# Altium PCB PCB-Thermostat.PcbDoc (part 4 of 5)
Units mm, origin at the board's own origin, x right, y up, seen from the top; angles counter-clockwise.
Board outline 100 x 90 mm, 4 copper layers (Top, PWR, GND, Bottom), stack 1.585 mm thick; 188 components, 167 nets, 703 pads, 398 vias.
Unrouted connection lines stored in the file: 2.
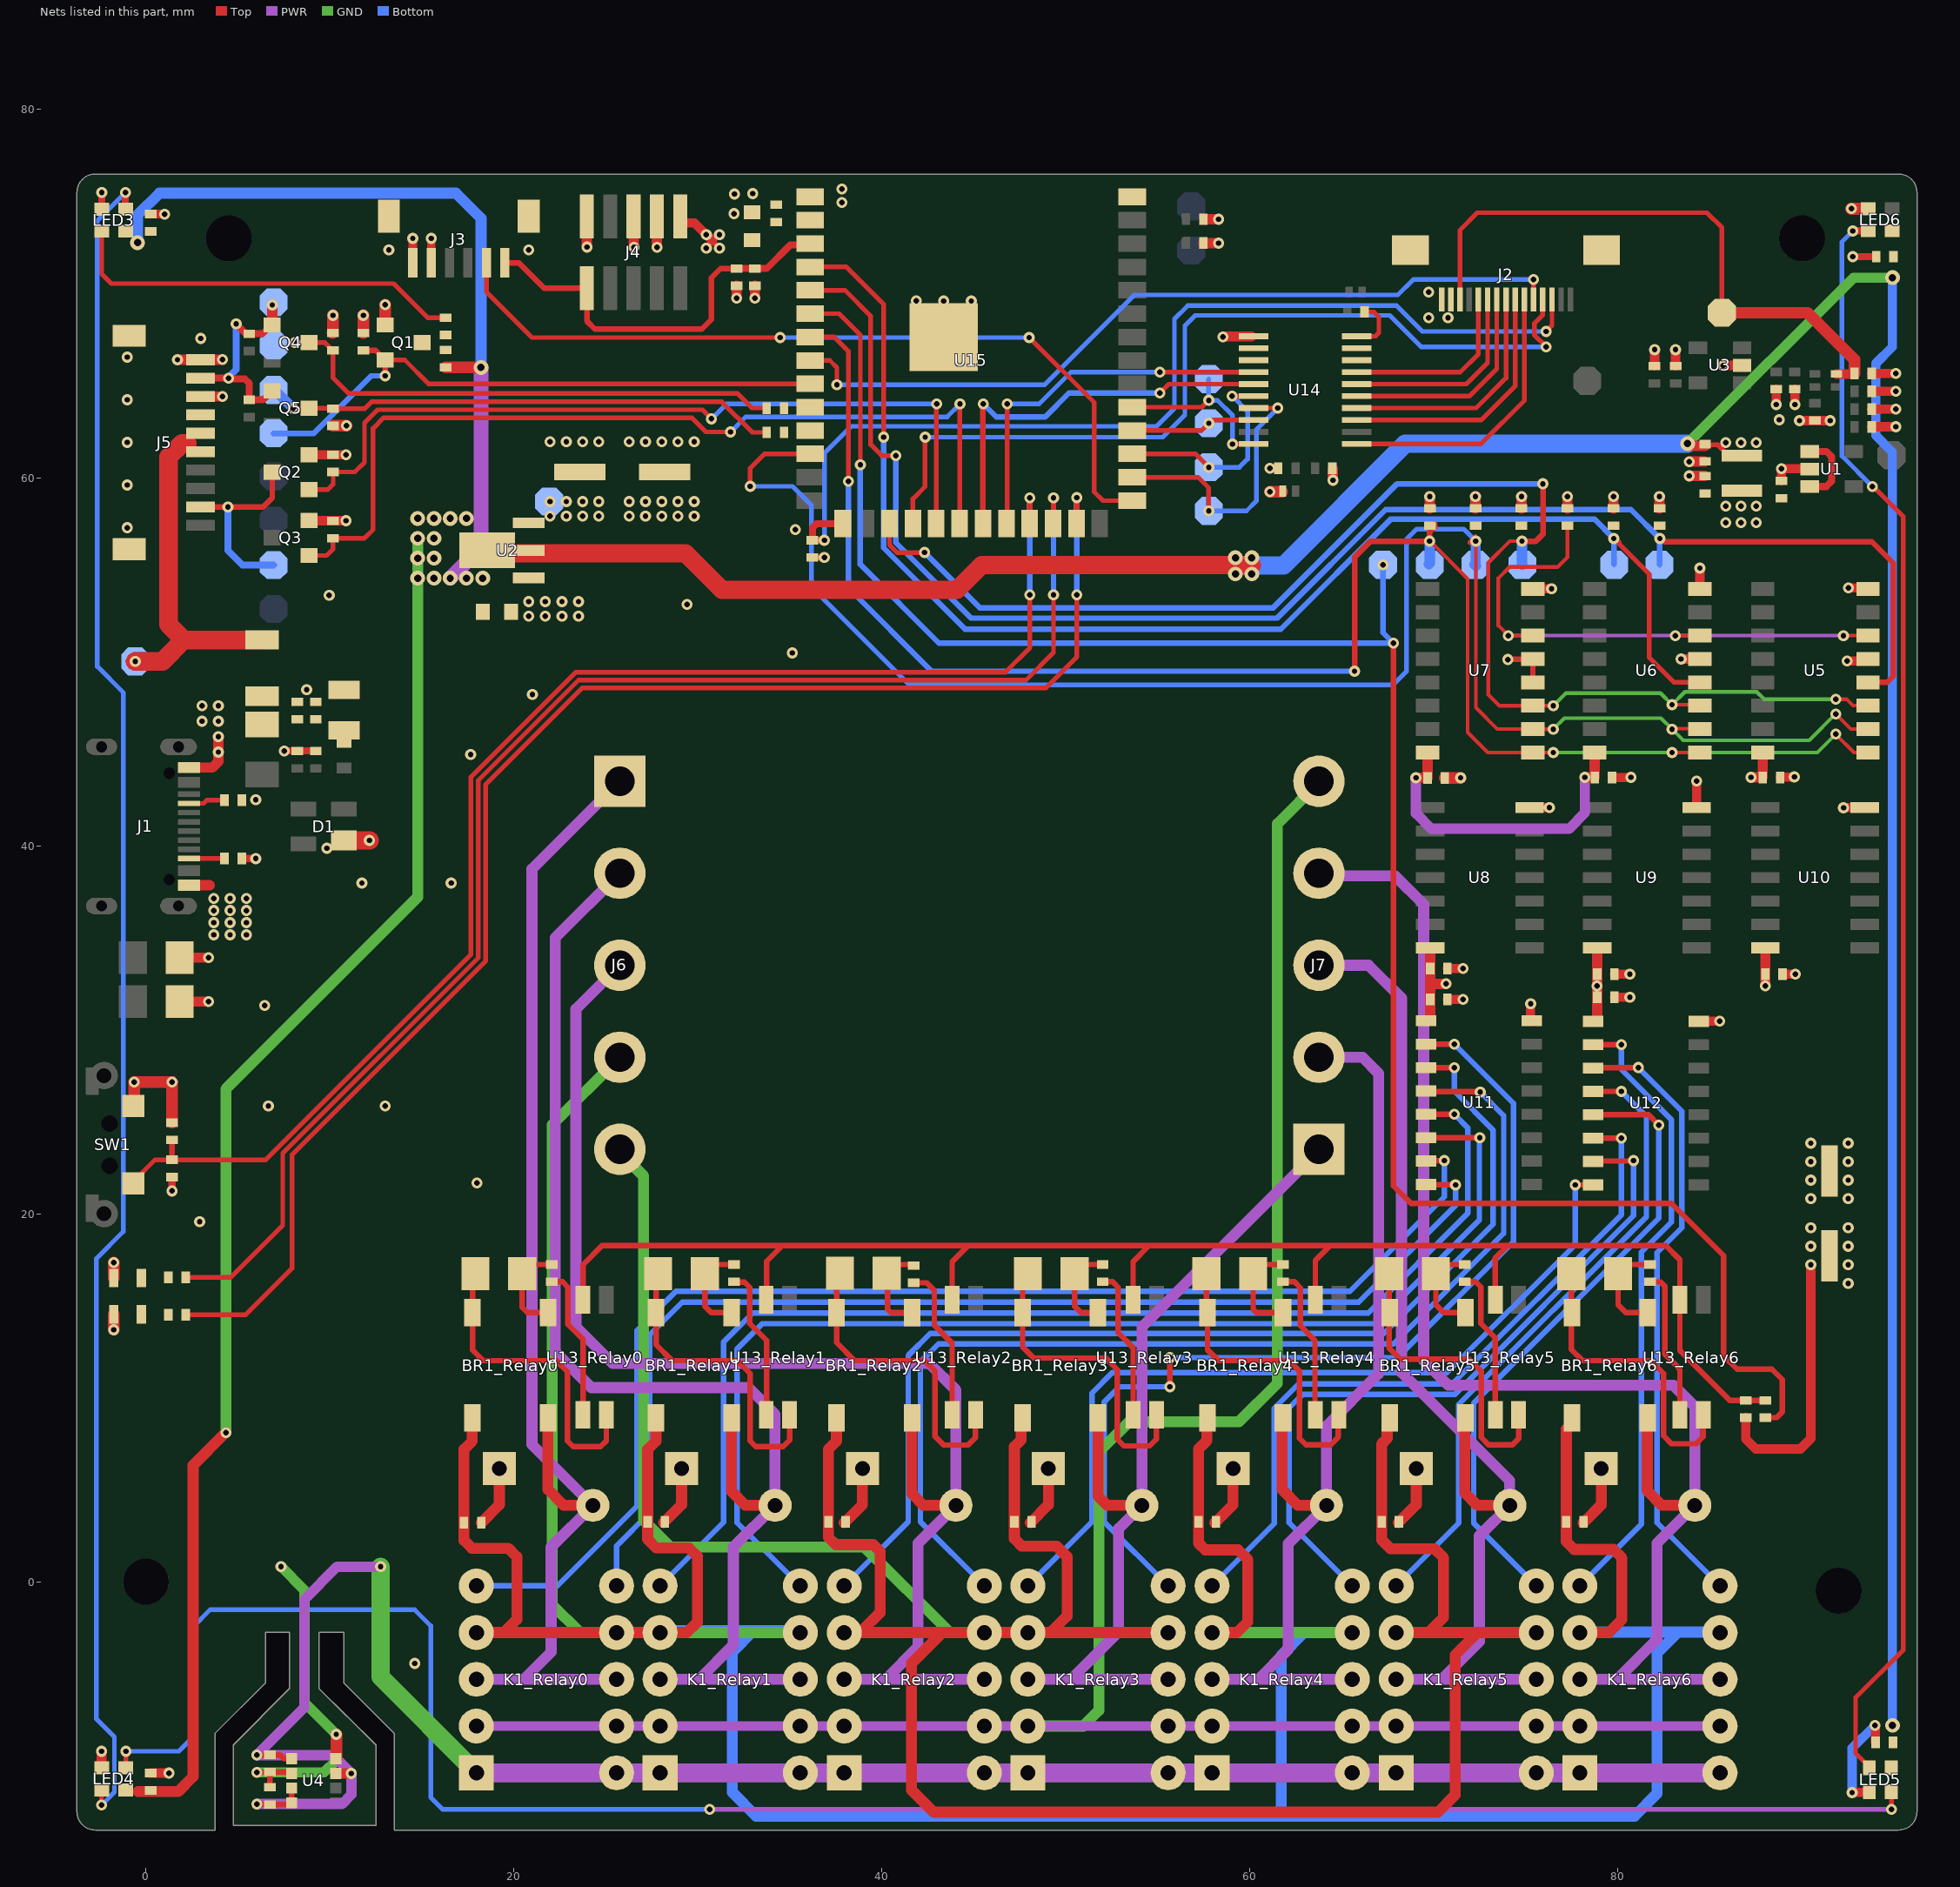
[diagram p4: the nets of this part, all layers, seen from the top]

## Via types
v1: diameter 0.6, hole 0.3, Top to Bottom, 374 vias
v2: diameter 0.8, hole 0.4, Top to Bottom, 22 vias
v3: diameter 0.6, hole 0.3, Top to Bottom, tented top, 2 vias

## Nets (pads, with @x,y where several pads share a name; then routed paths per layer and width w, separated by ;. In a path a pad name is that pad's centre, name@x,y a point inside that pad or via, vN(x,y) a via of type N, cw(c..) or ccw(c..) an arc to the next point about the centre after c; other vN are vias at no path point) (continued)
3V3_SENSOR: C12.1 FB3.2 J2.13 P2.1 | length 33.4
  Top w0.254: J2.13@71.414,69.679 71.414,73.454 72.357,74.397 84.835,74.397 85.649,73.583 P2.1@85.649,68.961 ; FB3.2@91.872,65.628 FB3.2@91.887,65.644
  Top w0.508: FB3.2@91.872,65.628 92.824,65.628 92.85,65.653 C12.1@92.85,65.659
  Top w0.635: P2.1@85.649,68.961 90.297,68.961 92.85,66.408 C12.1@92.85,65.659
5V_Clean: C2.1 C3.2 L1.2 U1.1 U1.3 | length 4
  Top w0.381: U1.3@90.421,59.515 91.321,59.515 91.621,59.815 91.621,61.135 91.34,61.415 U1.1@90.421,61.415
  other v1: 85.852,57.556 86.684,57.556 87.516,57.556 85.852,58.445 86.684,58.445 87.516,58.445
5V_TABLET: F2.2 J5.5 J5.6 P18.1 | length 19
  Top w1.016: v1(-0.584,50.013) 0.889,50.013 2.057,51.181 ; 2.248,61.862 1.968,61.862 1.219,61.112 1.219,52.019 2.057,51.181 ; F2.2@6.32,51.181 2.057,51.181
+1V8: J5.2 P19.1 Q4.1 Q5.1 R28.2 R30.2 | length 11.7
  Top w0.381: J5.2@2.961,65.409 v1(4.496,65.409) 4.529,65.375 5.367,65.375 5.613,65.129 R30.2@5.613,64.229 6.372,64.229 6.595,64.452 6.595,64.5 6.815,64.719 Q5.1@6.865,64.719 ; v1(4.902,68.351) 5.4,67.854 5.575,67.854 R28.2@5.613,67.816 6.334,67.816 6.815,68.296 Q4.1@6.865,68.296
  Top w0.559: Q4.1@6.865,68.296 v1(6.865,69.386)
  Bottom w0.381: v1(4.496,65.409) 4.496,65.468 4.902,65.874 v1(4.902,68.351)
  Bottom w0.559: P19.1@6.857,69.394 v1(6.865,69.386)
+3V3: C17.1 C18.1 C21.1 C22.1 C23.1 C24.1 C25.1 C26.1 C27.1 C28.1 C29.1 C30.1 C34.1 C35.1 FB6.2 J3.1 J4.1 K1_Relay0.1 K1_Relay0.10 K1_Relay1.1 K1_Relay1.10 K1_Relay2.1 K1_Relay2.10 K1_Relay3.1 K1_Relay3.10 K1_Relay4.1 K1_Relay4.10 K1_Relay5.1 K1_Relay5.10 K1_Relay6.1 K1_Relay6.10 P4.1 Q1.1 R4.2 R5.2 R6.2 R7.2 R8.2 R9.2 R10.2 R15.2 R16.2 R17.2 R20.2 R24.2 R29.1 R31.1 R32.2 U2.3 U4.2 U4.5 U4.6 U4.8 U5.16 U6.16 U7.16 U8.14 U9.14 U10.14 U11.9 U12.9 U15.2 | length 241.9
  Top w0.2: v1(6.02,-12.09) v1@6.032,-12.103 ; v1@6.02,-9.449 v1@6.041,-9.427 ; C21.1@6.71,-9.427 C21.1@6.731,-9.406 ; C22.1@6.718,-12.103 C22.1@6.731,-12.116
  Top w0.254: R31.1@9.995,62.802 R31.1@10.008,62.814 ; FB6.2@61.745,59.233 FB6.2@61.781,59.269
  Top w0.3: v1@6.032,-12.103 C22.1@6.718,-12.103 ; v1@6.041,-9.427 C21.1@6.71,-9.427 ; C22.1@6.731,-12.116 7.823,-12.116 U4.5@7.919,-12.02 U4.6@7.919,-11.22 ; C21.1@6.731,-9.406 6.751,-9.427 7.293,-9.427 7.487,-9.62 U4.8@7.919,-9.62 U4.8@7.816,-9.518 ; R32.2@36.223,55.659 v1(36.869,55.659)
  Top w0.406: v1(1.422,21.234) R20.2@1.422,21.989
  Top w0.457: v1(14.5,73) 14.505,72.995 J3.1@14.505,72.368
  Top w0.508: J4.1@29.046,74.873 29.046,73.963 29.166,73.843 29.814,73.843 30.803,72.854 ; R10.2@86.944,8.913 86.944,7.759 87.49,7.214 89.918,7.214 90.479,7.775 v1(90.479,17.219)
  Top w0.559: U4.2@10.566,-10.425 v1@11.161,-10.425 ; v1(32.106,69.748) R15.2@32.106,70.422 ; R16.2@57.467,72.746 v1(58.293,72.746) ; R17.2@57.518,74.041 v1(58.293,74.041) ; v3(69.019,43.686) C23.1@69.654,43.686 ; U11.9@69.569,30.479 69.774,30.479 69.794,30.5 C29.1@69.794,31.648 69.794,32.487 ; C23.1@69.654,43.686 U7.16@69.654,45.064 ; R5.2@69.774,58.327 v1(69.774,58.979) ; U8.14@69.794,34.449 C26.1@69.794,33.326 69.794,32.487 ; R6.2@72.256,58.327 v1(72.256,58.979) ; R7.2@74.756,58.327 v1(74.756,58.979) ; R4.2@77.256,58.327 v1(77.256,58.979) ; v3(78.2,43.709) C24.1@78.74,43.709 78.736,43.713 78.736,45.059 U6.16@78.731,45.064 ; U12.9@78.646,30.454 78.851,30.454 78.871,30.474 C30.1@78.871,31.759 78.869,31.761 78.869,32.377 v1(78.866,32.379) 78.869,32.381 78.869,33.006 C27.1@78.871,33.009 U9.14@78.871,34.449 ; R9.2@79.756,58.327 v1(79.756,58.979) ; R8.2@82.256,58.327 v1(82.256,58.979) ; v1(87.231,43.709) C25.1@87.866,43.709 U5.16@87.866,45.064 ; v1(88.006,32.379) C28.1@88.006,33.02 U10.14@88.006,34.449 ; 69.794,32.487 v1@70.656,32.487 ; v1@70.656,32.487 v1(70.657,32.488)
  Top w0.635: R29.1@10.147,67.869 10.16,67.882 v1(10.16,68.821) ; R31.1@10.173,62.827 v1(10.895,62.827) ; R24.2@11.811,67.856 v1(11.811,68.821) ; Q1.1@13.005,68.296 v1(13.005,69.393) ; v1(61.087,59.233) FB6.2@61.745,59.233
  PWR w0.559: v1@6.039,-12.083 10.65,-12.083 11.163,-11.57 v1(11.163,-10.427) ; v1@11.155,-10.419 10.16,-9.423 v1(6.02,-9.423) 8.6,-6.843 8.6,-0.969 10.382,0.813 v1(12.751,0.813) ; v3(69.019,43.686) 69.019,41.756 69.856,40.919 77.339,40.919 78.2,41.78 v3(78.2,43.709)
  PWR w1: K1_Relay0.1@17.958,-10.389 K1_Relay0.10@25.578,-10.389 K1_Relay1.1@27.94,-10.389 K1_Relay1.10@35.56,-10.389 K1_Relay2.1@37.948,-10.389 K1_Relay2.10@45.568,-10.389 K1_Relay3.1@47.93,-10.389 K1_Relay3.10@55.55,-10.389 K1_Relay4.1@57.937,-10.389 K1_Relay4.10@65.557,-10.389 K1_Relay5.1@67.945,-10.389 K1_Relay5.10@75.565,-10.389 K1_Relay6.1@77.927,-10.389 K1_Relay6.10@85.547,-10.389
  GND w0.559: v1@6.031,-12.09 v1@6.039,-12.083
  GND w1: v1(12.751,0.813) 12.751,-5.182 K1_Relay0.1@17.958,-10.389 K1_Relay0.10@25.578,-10.389 K1_Relay1.1@27.94,-10.389 K1_Relay1.10@35.56,-10.389 K1_Relay2.1@37.948,-10.389 K1_Relay2.10@45.568,-10.389 K1_Relay3.1@47.93,-10.389 K1_Relay3.10@55.55,-10.389 K1_Relay4.1@57.937,-10.389 K1_Relay4.10@65.557,-10.389 K1_Relay5.1@67.945,-10.389 K1_Relay5.10@75.565,-10.389 K1_Relay6.1@77.927,-10.389 K1_Relay6.10@85.547,-10.389
  other v1: 92.517,16.212 92.517,17.219 90.479,18.227 92.517,18.227 90.479,19.234 92.517,19.234 21.965,57.912 22.847,57.912 23.73,57.912 24.613,57.912 21.965,58.699 22.847,58.699 23.73,58.699 24.613,58.699 21.965,61.951 22.847,61.951 23.73,61.951 24.613,61.951 30.455,72.466 31.166,72.466 30.455,73.203 31.166,73.203
+5V: C1.2 C13.1 C38.1 C39.1 C40.1 C41.1 F1.2 L1.1 LED3.1 LED4.1 LED5.1 LED6.1 R25.1 U2.2 | length 286.1
  Top w0.254: C1.2@84.736,61.779 85.428,61.779 L1.1@85.961,61.246
  Top w0.559: v2@83.781,61.719 C1.2@84.736,61.719
  Top w0.6: -0.418,-11.405 1.753,-11.405 2.565,-10.592 2.565,6.325 v1(4.343,8.103)
  Top w0.635: R25.1@16.281,65.996 18.227,65.996 v2@18.237,65.986
  Top w1: U2.2@18.54,56.045 18.705,55.88 23.343,55.88 29.321,55.88 31.302,53.899 44.081,53.899 45.427,55.245 v2@60.096,55.245
  PWR w0.8: v2(16.535,54.534) 18.212,56.21 v2(18.212,65.986)
  GND w0.559: v2(83.781,61.846) 92.802,70.866 v2(94.92,70.866)
  GND w0.6: v1(4.343,8.103) 4.343,26.772 14.77,37.198 v2(14.77,54.534) v2(14.77,55.618) v2(14.77,56.701)
  Bottom w0.5: v2(94.92,-7.81) 94.92,61.392 94.005,62.306 94.005,66.192 94.92,67.107 v2(94.92,70.866)
  Bottom w0.6: v2(-0.457,72.771) -0.457,74.27 0.737,75.463 16.84,75.463 18.212,74.092 v2(18.212,65.986)
  Bottom w1: 59.258,55.232 61.822,55.232 68.435,61.845 v2(83.781,61.846)
  other v1: 85.852,61.9 86.684,61.9 87.516,61.9
  other v2: 15.653,54.534 17.418,54.534 18.301,54.534 59.207,54.762 60.096,54.762 15.653,55.618 59.207,55.643 60.096,55.643 15.653,56.701 14.77,57.785 15.653,57.785 16.535,57.785 17.418,57.785
+BATT: J5.4
A1: J2.6 U14.1 | length 15.5
  Top w0.254: U14.1@65.903,61.834 72.559,61.834 74.914,64.188 J2.6@74.914,69.679
A2: J2.7 U14.3 | length 14
  Top w0.254: U14.3@65.903,63.134 72.577,63.134 74.414,64.971 J2.7@74.414,69.679
A3: J2.8 U14.4 | length 13
  Top w0.254: U14.4@65.903,63.784 72.289,63.784 73.914,65.409 J2.8@73.914,69.679
A4: J2.9 U14.5 | length 11.9
  Top w0.254: U14.5@65.903,64.434 71.939,64.434 73.414,65.909 J2.9@73.414,69.679
A5: J2.10 U14.6 | length 10.9
  Top w0.254: U14.6@65.903,65.084 71.752,65.084 72.914,66.246 J2.10@72.914,69.679
A6: J2.11 U14.7 | length 9.9
  Top w0.254: U14.7@65.903,65.734 71.427,65.734 72.414,66.721 J2.11@72.414,69.679
A7: U14.8
A8: U14.9
B: BR1_Relay3.4 J7.1 K1_Relay3.3 K1_Relay3.8 RV1_Relay3.2 | length 48.9
  Top w0.6: BR1_Relay3.4@51.743,8.903 51.743,4.645 52.241,4.147 RV1_Relay3.2@54.127,4.147 RV1_Relay3.2@54.127,4.141
  PWR w0.6: K1_Relay3.3@47.93,-5.309 50.267,-5.309 ; K1_Relay3.8@55.55,-5.309 50.267,-5.309 ; J7.1@63.805,23.503 54.127,13.825 RV1_Relay3.2@54.127,4.147 52.863,2.882 52.863,-2.712 50.267,-5.309
B1: P16.1 U14.20 U15.31 | length 9.7
  Top w0.254: U15.31@53.6,63.83 57.386,63.83 v1(57.76,64.204) ; v1(59.055,61.824) 59.06,61.829 60.098,61.829 U14.20@60.103,61.834
  Bottom w0.254: P16.1@57.76,65.354 v1(57.76,64.204) 58.224,64.204 59.055,63.373 v1(59.055,61.824)
B2: P15.1 U14.18 U15.30 | length 6.7
  Top w0.254: U15.30@53.6,62.56 57.361,62.56 v1(57.76,62.958) 57.853,62.958 58.029,63.134 U14.18@60.103,63.134
B3: P13.1 U14.17 U15.28 | length 15.4
  Top w0.254: U15.28@53.6,60.02 57.183,60.02 57.76,59.443 v1(57.76,58.191) ; U14.17@59.82,63.784 U14.17@59.823,63.781 ; U14.17@60.103,63.784 v1(61.516,63.784)
  Bottom w0.254: v1(57.76,58.191) 59.807,58.191 60.343,58.727 60.343,62.611 v1(61.516,63.784)
B4: P14.1 U14.16 U15.29 | length 11.6
  Top w0.254: U15.29@53.6,61.29 57.032,61.29 v1(57.76,60.562) ; v1(59.03,64.44) 59.033,64.437 60.1,64.437 U14.16@60.103,64.434
  Bottom w0.254: v1(57.76,60.562) 59.422,60.562 59.871,61.011 59.871,63.599 v1(59.03,64.44)
B5: U14.15 U15.21 | length 22.1
  Top w0.254: v1(55.1,64.596) 55.588,65.084 U14.15@60.103,65.084
  Top w0.305: U15.21@45.49,57.5 v1@45.49,63.981
  Bottom w0.305: v1(45.509,64) 46.213,63.297 48.87,63.297 50.169,64.596 v1(55.1,64.596)
B6: U14.14 U15.22 | length 20.7
  Top w0.254: U15.22@46.779,57.424 46.783,57.428 46.812,57.457 v1(46.812,64) ; v1(55.1,65.734) U14.14@60.103,65.734
  Top w0.305: U15.22@46.783,57.42 U15.22@46.783,57.428
  Top w0.381: U15.22@46.779,57.424 U15.22@46.779,57.526
  Bottom w0.254: v1(46.812,64) 48.532,64 50.266,65.734 v1(55.1,65.734)
B7: U14.13
B8: U14.12
BR1_Relay0: BR1_Relay0.1 C31_Relay0.2 R13_Relay0.2 | length 5.2
  Top w0.3: BR1_Relay0.1@21.847,14.623 20.733,14.623 20.447,14.909 C31_Relay0.2@20.447,16.739 20.942,17.234 R13_Relay0.2@22.047,17.234
BR1_Relay1: BR1_Relay1.1 C31_Relay1.2 R13_Relay1.2 | length 5.2
  Top w0.3: BR1_Relay1.1@31.822,14.623 30.72,14.623 30.374,14.969 30.374,16.739 30.869,17.234 R13_Relay1.2@31.974,17.234
BR1_Relay2: BR1_Relay2.1 C31_Relay2.2 R13_Relay2.2 | length 5
  Top w0.3: BR1_Relay2.1@41.633,14.623 40.477,14.623 40.301,14.799 40.301,16.739 40.797,17.234 R13_Relay2.2@41.732,17.234
BR1_Relay3: BR1_Relay3.1 C31_Relay3.2 R13_Relay3.2 | length 5
  Top w0.3: BR1_Relay3.1@51.743,14.623 50.814,14.623 50.47,14.967 C31_Relay3.2@50.47,16.739 50.965,17.234 R13_Relay3.2@52.07,17.234
BR1_Relay4: BR1_Relay4.1 C31_Relay4.2 R13_Relay4.2 | length 5.4
  Top w0.3: R13_Relay4.2@61.773,17.234 60.668,17.234 C31_Relay4.2@60.173,16.739 60.173,14.799 60.348,14.623 BR1_Relay4.1@61.794,14.623
BR1_Relay5: BR1_Relay5.1 C31_Relay5.2 R13_Relay5.2 | length 5.3
  Top w0.3: R13_Relay5.2@71.704,17.234 R13_Relay5.2@71.679,17.234 71.425,17.234 70.599,17.234 C31_Relay5.2@70.104,16.739 70.104,15.047 70.528,14.623 BR1_Relay5.1@71.707,14.623
BR1_Relay6: BR1_Relay6.1 C31_Relay6.2 R13_Relay6.2 | length 5.5
  Top w0.3: BR1_Relay6.1@81.737,14.623 BR1_Relay6.1@81.606,14.623 80.434,14.623 80.01,15.047 C31_Relay6.2@80.01,16.739 80.505,17.234 R13_Relay6.2@81.737,17.234
BR2_Relay0: BR1_Relay0.2 C31_Relay0.1 U13_Relay0.2 | length 16.9
  Top w0.3: C31_Relay0.1@17.907,16.739 17.747,16.578 BR1_Relay0.2@17.747,14.623 17.747,12.59 18.323,12.014 22.302,12.014 22.911,11.405 22.911,7.645 23.212,7.345 24.708,7.345 25.019,7.655 25.019,8.468 U13_Relay0.2@25.073,8.522
BR2_Relay1: BR1_Relay1.2 C31_Relay1.1 U13_Relay1.2 | length 17.1
  Top w0.3: C31_Relay1.1@27.838,16.739 27.722,16.622 BR1_Relay1.2@27.722,14.623 27.722,12.876 28.589,12.009 32.145,12.009 32.838,11.316 32.838,7.645 33.137,7.346 34.637,7.346 34.979,7.688 U13_Relay1.2@34.979,9.068
BR2_Relay2: BR1_Relay2.2 C31_Relay2.1 U13_Relay2.2 | length 17.2
  Top w0.3: C31_Relay2.1@37.719,16.764 37.533,16.578 BR1_Relay2.2@37.533,14.623 37.533,12.991 38.511,12.014 42.317,12.014 42.879,11.452 42.879,7.896 43.353,7.422 44.684,7.422 45.088,7.826 U13_Relay2.2@45.088,9.068
BR2_Relay3: BR1_Relay3.2 C31_Relay3.1 U13_Relay3.2 | length 17.3
  Top w0.3: C31_Relay3.1@47.93,16.739 47.643,16.451 BR1_Relay3.2@47.643,14.623 47.643,12.756 48.244,12.154 52.164,12.154 52.791,11.527 52.791,7.746 53.163,7.374 54.542,7.374 54.918,7.749 U13_Relay3.2@54.918,9.068
BR2_Relay4: BR1_Relay4.2 C31_Relay4.1 U13_Relay4.2 | length 16.9
  Top w0.3: C31_Relay4.1@57.633,16.739 57.633,14.684 BR1_Relay4.2@57.694,14.623 57.694,12.601 58.281,12.014 62.116,12.014 62.687,11.443 62.687,7.798 63.043,7.442 64.389,7.442 64.798,7.851 U13_Relay4.2@64.798,9.068
BR2_Relay5: BR1_Relay5.2 C31_Relay5.1 U13_Relay5.2 | length 16.8
  Top w0.3: C31_Relay5.1@67.564,16.739 67.564,14.623 67.564,12.699 68.167,12.095 71.902,12.095 72.571,11.426 72.571,7.834 72.963,7.442 74.263,7.442 74.603,7.782 U13_Relay5.2@74.603,9.068
BR2_Relay6: BR1_Relay6.2 C31_Relay6.1 U13_Relay6.2 | length 16.7
  Top w0.3: C31_Relay6.1@77.47,16.739 77.47,12.618 78.074,12.014 81.777,12.014 82.474,11.316 82.474,7.929 82.905,7.497 84.256,7.497 84.636,7.877 U13_Relay6.2@84.636,9.068
C: J7.5 K1_Relay0.2 K1_Relay0.9 K1_Relay1.2 K1_Relay1.9 K1_Relay2.2 K1_Relay2.9 K1_Relay3.2 K1_Relay3.9 K1_Relay4.2 K1_Relay4.9 K1_Relay5.2 K1_Relay5.9 K1_Relay6.2 K1_Relay6.9 | length 131
  PWR w0.508: K1_Relay0.2@17.958,-7.849 K1_Relay0.9@25.578,-7.849 K1_Relay1.2@27.94,-7.849 K1_Relay1.9@35.56,-7.849 K1_Relay2.2@37.948,-7.849 K1_Relay2.9@45.568,-7.849 K1_Relay3.2@47.93,-7.849 K1_Relay3.9@55.55,-7.849 K1_Relay4.2@57.937,-7.849 K1_Relay4.9@65.557,-7.849 K1_Relay5.2@67.945,-7.849 K1_Relay5.9@75.565,-7.849 K1_Relay6.9@85.547,-7.849
  GND w0.5: K1_Relay3.2@47.742,-7.734 K1_Relay3.2@47.93,-7.734
  GND w0.6: K1_Relay3.2@47.93,-7.849 50.936,-7.849 51.791,-6.994 51.791,7.047 53.431,8.687 59.394,8.687 61.491,10.783 61.491,41.188 J7.5@63.805,43.503
E3: R4.1 U5.6 U6.6 U7.6 | length 31.5
  Top w0.2: U7.6@75.374,51.414 v1(74.041,51.414) 73.499,51.956 73.499,54.534 74.109,55.143 76.72,55.143 77.256,55.679 R4.1@77.256,57.387 ; v1(83.118,51.414) U6.6@84.451,51.414 ; v1(92.253,51.414) U5.6@93.586,51.414
  PWR w0.2: v1(74.041,51.414) v1(83.118,51.414) v1(92.253,51.414)
EN_ESP: C36.2 J3.6 J4.10 R15.1 U15.3 | length 22.4
  Top w0.305: J3.6@19.5,71.674 20.263,71.674 21.637,70.3 J4.10@23.96,70.3 23.96,68.515 24.401,68.074 30.211,68.074 30.734,68.597 30.734,70.866 31.229,71.361 R15.1@32.207,71.361
  Top w0.381: R15.1@32.207,71.361 C36.2@33.096,71.361 33.733,71.361 35.016,72.644 U15.3@36.119,72.644
ESP_RXD: P25.1 Q5.3 R19.2 R31.2 | length 27.9
  Top w0.254: v1(8.003,63.759) 8.854,63.759 Q5.3@8.865,63.769 R31.2@9.992,63.769 ; R31.2@10.16,63.754 11.897,63.754 12.261,64.119 31.296,64.119 32.956,62.459 R19.2@33.731,62.459
  Bottom w0.559: P25.1@6.925,64.76 7.002,64.76 v1@7.995,63.767
ESP_TXD: P23.1 Q4.3 R18.2 R29.2 | length 28
  Top w0.254: v1(8.09,67.346) Q4.3@8.865,67.346 9.706,67.346 9.969,67.082 9.969,67.018 10.071,66.916 R29.2@10.16,66.916 10.16,65.427 11.019,64.568 32.158,64.568 32.946,63.779 R18.2@33.731,63.779
G: BR1_Relay1.4 J6.2 K1_Relay1.3 K1_Relay1.8 RV1_Relay1.2 | length 71.2
  Top w0.6: BR1_Relay1.4@31.822,8.903 31.822,4.907 32.582,4.147 RV1_Relay1.2@34.188,4.147
  PWR w0.6: J6.2@25.75,38.5 22.238,34.988 22.238,12.506 24.203,10.541 32.746,10.541 34.188,9.098 RV1_Relay1.2@34.188,4.147 31.928,1.886 31.928,-3.44 30.059,-5.309 ; K1_Relay1.3@27.94,-5.309 30.059,-5.309 ; K1_Relay1.8@35.56,-5.309 30.059,-5.309
GND: C1.1 C2.2 C3.1 C4.2 C5.2 C6.1 C7.2 C8.2 C9.2 C10.2 C11.2 C12.2 C13.2 C14.2 C15.2 C16.1 C17.2 C18.2 C19.2 C20.1 C21.2 C22.2 C23.2 C24.2 C25.2 C26.2 C27.2 C28.2 C29.2 C30.2 C33.2 C34.2 C35.2 C36.1 C37.2 C38.2 C39.2 C40.2 C41.2 C.1 D1.1 J1.A1/B12 J1.B1/A12 J2.14 J2.15 J2.MP1 J2.MP2 J3.2 J3.MP1 J3.MP2 J4.3 J4.5 J4.9 J5.1 J5.3 J5.MP1 J5.MP2 LED1.2 LED2.2 LED3.3 LED4.3 LED5.3 LED6.3 Q2.2 Q3.2 R1.1 R2.1 R3.1 R23.2 R27.2 SW1.2 U1.2 U2.1 U3.2 U4.1 U4.7 U5.5 U5.8 U6.5 U6.8 U7.4 U7.5 U7.8 U8.7 U9.7 U10.7 U11.8 U12.8 U14.11 U15.1 U15.40 U15.41 | length 105
  Top w0.2: U5.5@93.48,50.038 U5.5@93.586,50.144 ; U5.8@93.54,54 U5.8@93.586,53.954
  Top w0.254: U14.11@60.103,67.684 U14.11@60.119,67.7 ; v1(61.087,60.508) 61.089,60.51 61.531,60.51 C33.2@61.533,60.512 ; C.1@64.476,60.512 C.1@64.48,60.508
  Top w0.3: v1(6.02,-10.363) 6.028,-10.355 6.722,-10.355 C21.2@6.731,-10.346 ; C22.2@6.731,-11.176 C21.2@6.731,-10.346 ; U4.7@7.919,-10.42 7.844,-10.346 C21.2@6.731,-10.346 ; v1(74.016,50.114) 74.03,50.129 75.105,50.129 75.119,50.144 75.374,50.144 U7.4@75.374,48.874 ; U9.7@83.729,42.069 84.102,42.069 U9.7@84.252,42.219 ; v1@92.177,42.012 v1@92.205,42.04 ; U10.7@92.729,42.069 92.781,42.069 92.787,42.063 U10.7@92.787,42.035 ; U10.7@92.781,42.04 U10.7@92.787,42.035 ; U10.7@92.787,42.012 U10.7@92.787,42.035
  Top w0.381: LED3.3@-2.403,74.59 v1(-2.403,75.489) ; v1(7.51,45.144) C11.2@8.23,45.144 C9.2@9.23,45.144 ; v1(92.766,72.009) C41.2@94.033,72.009
  Top w0.406: R3.1@5.207,39.294 R3.1@5.207,39.294 5.968,39.295 v1(5.969,39.296)
  Top w0.457: C38.2@0.256,74.322 0.479,74.322 0.989,74.322 v1@1.016,74.295 ; v1(15.5,73) 15.505,72.995 J3.2@15.505,72.368
  Top w0.5: C29.2@70.734,31.648 v1(71.577,31.648) ; C26.2@70.734,33.326 v1(71.577,33.326) ; U8.7@75.194,42.069 v1(76.276,42.069) ; v1(75.254,31.401) 75.254,30.529 75.354,30.429 U11.8@75.489,30.429 ; U7.8@75.374,53.954 v1(76.394,53.954) ; C24.2@79.68,43.709 v1(80.7,43.709) ; C30.2@79.811,31.759 v1(80.645,31.759) ; C27.2@79.811,33.009 v1(80.645,33.009) ; v1(83.431,50.144) U6.5@84.451,50.144 ; U9.7@84.271,42.069 v1(84.271,43.504) ; U12.8@84.396,30.454 v1(85.522,30.455) ; U6.8@84.451,53.954 v1(84.451,55.085) ; C25.2@88.806,43.709 88.821,43.724 89.571,43.724 v1(89.586,43.739) ; C2.2@88.887,59.815 v1(88.887,60.49) ; C28.2@88.946,33.02 v1(89.637,33.02) ; v1@92.267,42.069 U10.7@92.729,42.069 ; v1(92.46,50.038) U5.5@93.48,50.038 ; v1(92.52,54) U5.8@93.54,54 ; v1@92.738,-11.443 LED5.3@93.636,-11.443 ; U10.7@92.781,42.069 U10.7@93.406,42.069 ; C40.2@93.983,-8.717 v1@93.983,-7.82
  Top w0.508: C39.2@0.256,-10.404 v1(1.255,-10.404) ; Q2.2@8.865,61.245 R23.2@10.173,61.245 v1(10.878,61.245) ; Q3.2@8.876,57.657 R27.2@10.149,57.657 ; R27.2@10.173,57.658 v1(10.878,57.658) ; C20.1@81.991,66.065 v1(81.991,66.954) ; C19.2@83.131,66.065 v1(83.131,66.954) ; v1(85.725,66.091) 85.731,66.097 86.738,66.097 U3.2@86.744,66.103 ; v1(88.601,63.973) C15.2@88.601,64.802 ; v1(88.887,60.49) 90.396,60.49 U1.2@90.421,60.465 ; v1(89.612,63.973) C16.1@89.612,64.802 ; v1(89.868,63.1) C7.2@90.697,63.1 ; C7.2@90.71,63.1 v1(91.539,63.1) ; C14.2@93.783,64.7 C14.2@93.789,64.694 v1(95.1,64.694) ; C5.2@93.789,62.763 v1(95.1,62.763) ; C6.1@93.789,63.729 v1(95.1,63.729) ; C12.2@93.789,65.659 v1(95.1,65.659)
  Top w0.559: LED4.3@-2.413,-10.108 v1(-2.413,-9.22) ; v1@1.717,66.409 J5.1@2.961,66.409 v1@4.157,66.409 ; R1.1@1.829,31.521 v1(3.404,31.521) ; C4.2@1.829,34.417 C4.2@2.108,34.138 ; C4.2@2.108,33.63 2.108,33.706 2.311,33.909 v1(3.404,33.909) ; J1.B1/A12@2.34,37.846 3.455,37.846 ; J1.A1/B12@2.34,44.246 3.61,44.246 3.937,44.574 v1(3.937,45.085) v1@3.937,45.796 ; J5.3@2.961,64.409 2.967,64.414 2.97,64.412 v1@4.166,64.412 ; Q3.2@8.865,57.668 Q3.2@8.876,57.657 ; v1(23.966,72.528) 23.963,72.531 23.963,74.568 J4.9@23.966,74.571 ; v1(26.518,72.52) 26.51,72.528 26.51,74.575 J4.5@26.518,74.582 ; v1(27.77,72.52) J4.3@27.77,74.565 ; v1(33.096,69.748) C36.1@33.096,70.422 ; v1@58.551,67.668 U14.11@60.087,67.668 ; C.1@64.502,60.474 64.502,59.868 v1(64.51,59.86) ; v1(83.871,60.096) C3.1@84.719,60.096 ; v1(83.874,60.864) 83.882,60.872 C1.1@84.698,60.872 ; v1(92.685,74.625) v1@92.689,74.62 ; LED6.3@93.605,74.62 LED6.3@93.609,74.616
  Top w0.635: v1(-1.75,13.691) LED1.2@-1.75,14.529 ; LED2.2@-1.75,16.51 v1(-1.75,17.348) ; SW1.2@-0.635,26 v1(-0.635,27.153) v1(1.422,27.153) C37.2@1.422,24.943 ; U4.1@10.344,-9.595 v1(10.344,-8.3) ; C23.2@70.594,43.686 v1(71.45,43.686)
  Top w0.66: v1@92.689,74.62 LED6.3@93.605,74.62
  Top w1.016: D1.1@10.76,40.286 10.95,40.286 10.952,40.284 v1(12.141,40.284)
  GND w0.559: v1(6.02,-10.363) 9.677,-10.363 10.344,-9.696 v1(10.344,-8.3) 8.611,-6.566 8.611,-0.457 v1(7.341,0.813)
  Bottom w0.5: v1(92.728,-11.462) 92.728,-9.045 v1(93.963,-7.81)
  Bottom w0.559: v1@6.649,25.851 v1@6.655,25.857
  other v1: 14.605,-4.445 2.921,19.558 90.479,20.812 92.517,20.812 17.983,21.666 90.479,21.819 92.517,21.819 90.479,22.827 92.517,22.827 90.479,23.834 92.517,23.834 6.655,25.851 13.005,25.851 6.447,31.314 3.683,35.154 4.572,35.154 5.461,35.154 3.683,35.814 4.572,35.814 5.461,35.814 3.683,36.474 4.572,36.474 5.461,36.474 3.683,37.135 4.572,37.135 5.461,37.135 11.733,37.968 16.586,37.968 9.835,39.862 92.258,42.059 5.969,42.494 17.648,44.958 3.937,45.923 3.048,46.761 3.937,46.761 3.048,47.6 3.937,47.6 21.006,48.209 8.731,48.472 35.128,50.47 20.805,52.476 21.707,52.476 22.609,52.476 23.511,52.476 29.413,53.111 20.805,53.264 21.707,53.264 22.609,53.264 23.511,53.264 9.959,53.604 35.294,57.172 -1.016,57.277 26.264,57.912 27.146,57.912 28.029,57.912 28.912,57.912 29.794,57.912 26.264,58.699 27.146,58.699 28.029,58.699 28.912,58.699 29.794,58.699 -1.016,59.595 -1.016,61.913 26.264,61.951 27.146,61.951 28.029,61.951 28.912,61.951 29.794,61.951 88.773,63.144 -1.016,64.23 4.166,64.414 1.714,66.406 4.157,66.412 -1.016,66.548 2.976,67.564 58.535,67.651 69.714,68.688 70.764,68.688 43.358,69.596 44.853,69.596 41.862,69.603 69.714,70.079 13.2,72.368 20.8,72.368 1.016,74.32 31.953,74.346 37.821,74.955 31.979,75.413 32.969,75.438 37.821,75.692
GPIO3: J2.3 R32.1 U15.15 | length 55.5
  Top w0.254: v1(76.1,67.945) 76.1,67.953 76.414,68.267 J2.3@76.414,69.679
  Top w0.381: v1(36.869,56.598) R32.1@36.223,56.598 36.223,57.277 36.446,57.5 U15.15@37.87,57.5
  Bottom w0.254: v1(36.869,56.598) 36.869,61.33 38.329,62.789 54.923,62.789 55.895,63.761 55.895,68.621 56.617,69.342 67.97,69.342 69.367,67.945 v1@75.948,67.945
GPIO4: P8.1 R9.1 U6.4 U15.4 | length 74.5
  Top w0.254: U15.4@36.1,71.45 38.064,71.45 40.096,69.418 v1(40.096,62.2) ; v1(79.774,56.693) 79.858,56.693 80.061,56.49 80.061,56.406 81.692,54.774 81.692,50.235 83.054,48.874 U6.4@84.451,48.874
  Bottom w0.305: v1(40.096,62.2) 40.096,56.185 44.52,51.76 61.675,51.76 67.667,57.752 78.714,57.752 v1(79.774,56.693) P8.1@79.774,55.283
GPIO5: P9.1 R8.1 U5.4 U15.5 | length 86
  Top w0.254: U15.5@36.1,70.18 37.988,70.18 39.388,68.781 39.388,61.792 39.979,61.2 v1(40.749,61.2)
  Top w0.305: v1(82.274,56.693) 82.375,56.794 82.375,56.675 82.536,56.515 93.798,56.515 94.964,55.349 94.964,49.207 94.63,48.874 U5.4@93.586,48.874
  Bottom w0.305: v1(40.749,61.2) 40.749,56.463 44.848,52.365 61.476,52.365 67.375,58.263 80.703,58.263 v1(82.274,56.693) ; P9.1@82.256,55.265 v1@82.256,56.693
GPIO6: P10.1 R11.2 U15.6 | length 112.1
  Top w0.254: U15.6@36.1,68.91 37.677,68.91 38.825,67.762 v1(38.825,60.7)
  Top w0.3: v1@67.804,51.159 v1(67.804,51.003) 67.804,21.509 68.754,20.559 82.904,20.559 85.747,17.717 85.747,12.267 86.47,11.544 88.369,11.544 88.925,10.987 88.925,9.219 88.619,8.913 R11.2@88.006,8.913
  Bottom w0.305: v1(38.825,60.7) 38.825,55.278 43.099,51.003 v1(67.804,51.003) 67.234,51.573 v1(67.234,55.265)
GPIO7: P5.1 R5.1 U5.1 U6.1 U7.1 U15.7 | length 93.6
  Top w0.2: v1(69.766,56.545) v1@69.794,56.545 ; U7.1@75.379,45.06 v1(76.486,45.06) ; v1(82.936,45.059) 84.446,45.059 U6.1@84.451,45.064 ; v1(91.836,46.059) 92.831,45.064 U5.1@93.586,45.064
  Top w0.203: v1@69.794,56.545 71.832,54.507 71.832,46.161 72.929,45.064 U7.1@75.374,45.064
  Top w0.254: U15.7@36.1,67.64 37.411,67.64 38.175,66.876 v1(38.175,59.8)
  Top w0.305: v1(65.684,49.479) 65.684,55.675 66.554,56.545 v1@69.695,56.545 ; v1@69.695,56.487 v1@69.695,56.545 ; R5.1@70.053,57.48 70.053,57.328 69.766,57.041 v1(69.766,56.545) ; v1@69.695,56.545 69.695,56.617 v1(69.766,56.545) ; v1@69.695,56.545 v1(69.766,56.545)
  GND w0.2: v1@76.487,45.059 v1(82.936,45.059) 90.836,45.059 v1(91.836,46.059)
  Bottom w0.305: v1(38.175,59.8) 38.175,54.002 42.697,49.479 v1(65.684,49.479)
  Bottom w0.559: P5.1@69.732,55.299 69.77,55.337 69.77,56.541 v1(69.766,56.545)
GPIO8: P6.1 R6.1 U5.2 U6.2 U7.2 U15.12 | length 95.1
  Top w0.2: U7.2@75.379,46.33 v1(76.486,46.33) ; v1@82.936,46.359 84.426,46.359 U6.2@84.451,46.334 ; v1(91.836,47.159) 92.661,46.334 U5.2@93.586,46.334
  Top w0.203: v1(72.274,56.545) 72.274,47.503 73.443,46.334 U7.2@75.374,46.334
  Top w0.254: v1(32.842,59.525) 32.842,60.51 33.622,61.29 U15.12@36.1,61.29 ; 71.951,56.472 71.951,56.49 v1@72.14,56.679 ; v1@72.256,56.794 v1@72.14,56.679 ; v1(72.274,56.545) v1@72.14,56.679
  GND w0.2: v1(76.486,46.33) 77.087,46.931 82.335,46.931 v1(82.936,46.33) 83.546,45.72 90.397,45.72 v1(91.836,47.159)
  Bottom w0.254: v1(32.842,59.525) 35.141,59.525 36.17,58.496 36.17,54.051 41.478,48.743 67.793,48.743 68.504,49.454 68.504,56.642 69.067,57.205 71.614,57.205 v1(72.274,56.545)
  Bottom w0.559: P6.1@72.274,55.203 72.212,55.265 72.268,55.321 72.268,56.54 v1(72.274,56.545)
GPIO9: P7.1 R7.1 U5.3 U6.3 U7.3 U15.17 | length 79.3
  Top w0.2: U7.3@75.374,47.604 U7.3@75.379,47.6 ; v1(82.936,47.659) 84.396,47.659 U6.3@84.451,47.604 ; v1(91.836,47.959) 92.427,47.959 92.768,47.617 93.573,47.617 U5.3@93.586,47.604
  Top w0.203: v1(74.782,56.545) 74.122,56.545 72.952,55.376 72.952,48.206 73.554,47.604 U7.3@75.374,47.604 ; U7.3@75.379,47.6 v1(76.486,47.6)
  Top w0.254: U15.17@40.41,57.5 40.41,56.333 40.813,55.931 v1(42.316,55.931)
  Top w0.305: v1(74.782,56.545) 75.538,56.545 75.921,56.928 v1(75.921,59.665)
  GND w0.2: v1@76.498,47.6 v1(76.486,47.6) 77.172,48.285 82.31,48.285 v1(82.936,47.659) 83.636,48.359 87.536,48.359 87.936,47.959 v1(91.836,47.959)
  Bottom w0.305: v1(42.316,55.931) 45.319,52.928 61.264,52.928 68,59.665 v1(75.921,59.665)
  Bottom w0.559: v1(74.782,56.545) 74.79,56.537 74.79,55.278 P7.1@74.803,55.265
GPIO10: J2.4 U15.18 | length 47.9
  Top w0.254: U15.18@41.68,57.5 41.68,58.85 42.346,59.516 v1(42.346,62.2) ; J2.4@75.914,69.679 75.914,68.838 75.449,68.373 75.449,67.761 v1@76.099,67.111
  Bottom w0.254: v1(42.346,62.2) 55.266,62.2 56.46,63.394 56.46,68.254 57.022,68.816 67.594,68.816 69.3,67.11 v1@75.946,67.11
  other v1: 76.1,67.11
GPIO11: Q2.1 R23.1 U15.19 | length 44.6
  Top w0.254: Q2.1@8.865,59.345 9.878,59.345 10.173,59.639 R23.1@10.173,60.305 11.345,60.305 11.874,60.835 11.874,62.97 12.592,63.687 30.242,63.687 v1(30.734,63.195) ; U15.19@42.95,57.5 42.95,63.981 v1(42.969,64)
  Bottom w0.254: v1(30.734,63.195) 31.539,64 v1(42.969,64)
GPIO12: Q3.1 R27.1 U15.20 | length 49.5
  Top w0.254: Q3.1@8.865,55.768 9.82,55.768 10.16,56.109 R27.1@10.16,56.706 11.874,56.706 12.344,57.175 12.344,62.676 12.923,63.255 29.661,63.255 30.434,62.482 31.773,62.482 v1(31.775,62.484) ; U15.20@44.22,57.5 44.22,63.981 v1(44.239,64)
  Bottom w0.254: v1(31.775,62.484) 32.588,63.297 43.536,63.297 v1(44.239,64)
GPIO15: J2.5 U15.8 | length 43.9
  Top w0.254: U15.8@36.1,66.37 37.16,66.37 37.548,65.982 v1(37.548,65.054) ; J2.5@75.414,69.679 v1(75.414,70.764)
  Bottom w0.254: v1(37.548,65.054) 48.848,65.054 53.721,69.926 68.033,69.926 68.872,70.764 v1(75.414,70.764)
GPIO16: P17.1 Q1.2 R24.1 U15.9 | length 33.3
  Top w0.254: Q1.2@13.005,66.396 14.063,66.396 15.359,65.1 U15.9@36.1,65.1
  Top w0.305: R24.1@11.811,66.916 12.484,66.916 12.697,66.703 12.697,66.653 12.955,66.396 Q1.2@13.005,66.396 v1(13.005,65.532)
  Bottom w0.305: P17.1@6.934,62.408 9.119,62.408 12.243,65.532 v1(13.005,65.532)
GPIO21: C37.1 R20.1 SW1.1 U15.23 | length 77.1
  Top w0.254: SW1.1@-0.678,21.756 0.494,22.929 R20.1@1.422,22.929 6.507,22.929 17.653,34.074 17.653,43.713 23.368,49.428 46.711,49.428 48.039,50.757 v1(48.039,53.623)
  Top w0.305: R20.1@1.422,22.929 C37.1@1.422,24.003 ; v1(48.039,58.9) 48.039,57.515 48.039,57.414 U15.23@48.049,57.424
  Top w0.559: U15.23@48.039,57.515 U15.23@48.049,57.526
  Bottom w0.305: v1(48.039,53.623) v1(48.039,58.9)
GPIO47: R22.2 U15.24 | length 79.1
  Top w0.254: R22.2@2.159,16.535 4.597,16.535 7.435,19.373 7.435,23.282 18.059,33.906 18.059,43.545 23.511,48.997 47.828,48.997 49.323,50.491 v1(49.323,53.623)
  Top w0.305: U15.24@49.319,57.424 49.323,57.42 49.323,57.522 v1(49.323,58.906)
  Top w0.559: U15.24@49.319,57.526 U15.24@49.323,57.522
  Bottom w0.305: v1(49.323,53.623) v1(49.323,58.906)
GPIO48: R21.2 U15.25 | length 82.6
  Top w0.254: R21.2@2.159,14.503 5.41,14.503 7.945,17.038 7.945,23.217 18.466,33.738 18.466,43.332 23.698,48.565 48.895,48.565 50.589,50.259 v1(50.589,53.623)
  Top w0.305: U15.25@50.589,57.424 v1(50.589,58.91)
  Bottom w0.305: v1(50.589,53.623) v1(50.589,58.91)
IO0: J3.5 U15.27 | length 44.2
  Top w0.254: J3.5@18.5,71.674 18.5,70.101 20.986,67.615 v1(34.468,67.615) ; v1(48,67.615) 51.532,64.082 51.532,59.229 52.011,58.75 U15.27@53.6,58.75
  Bottom w0.254: v1(34.468,67.615) v1(48,67.615)
NetC8_1: C8.1 F1.1 FB1.2
NetC10_1: C10.1 F2.1 FB2.2
NetJ1_A5: J1.A5 R2.2 | length 2
  Top w0.254: J1.A5@2.34,42.296 3.122,42.296 3.295,42.469 R2.2@4.267,42.469
NetJ1_B5: J1.B5 R3.2 | length 1.9
  Top w0.254: J1.B5@2.34,39.296 2.341,39.295 4.266,39.295 R3.2@4.267,39.294
NetLED1_1: LED1.1 R21.1
NetLED2_1: LED2.1 R22.1
NetLED3_2: LED3.2 LED4.4 | length 91.9
  Top w0.254: v1(-2.413,-12.141) LED4.4@-2.413,-11.329 ; LED3.2@-1.118,74.605 LED3.2@-1.103,74.59
  Top w0.381: LED3.2@-1.118,74.605 v1(-1.118,75.489)
  Bottom w0.254: v1(-2.413,-12.141) -1.715,-11.443 -1.715,-8.445 -2.692,-7.468 -2.692,17.566 -1.232,19.026 -1.232,48.324 -2.642,49.733 -2.642,73.965 v1(-1.118,75.489)
NetLED3_4: LED3.4 R26.1 | length 22
  Top w0.254: LED3.4@-2.403,73.39 -2.403,71.064 -1.88,70.542 13.458,70.542 15.304,68.695 R26.1@16.281,68.695
NetLED4_2: LED4.2 LED5.4 | length 114.5
  Top w0.254: LED4.2@-1.092,-10.108 v1(-1.092,-9.22) ; v1(94.859,-12.379) LED5.4@94.859,-11.42
  PWR w0.254: v1(30.632,-12.379) v1(94.859,-12.379)
  Bottom w0.254: v1(-1.092,-9.22) 1.778,-9.22 2.591,-8.407 2.591,-2.426 3.493,-1.524 14.601,-1.524 15.475,-2.398 15.475,-11.725 16.129,-12.379 v1(30.632,-12.379)
NetLED5_2: LED5.2 LED6.4 | length 87.4
  Top w0.254: v1(92.761,73.406) v1@92.766,73.411 ; LED6.4@93.605,73.411 LED6.4@93.609,73.416 ; LED5.2@93.659,-10.12 93.659,-10.07 92.913,-9.323 92.913,-6.299 95.508,-3.704 95.508,57.882 93.878,59.512 v1(93.832,59.512)
  Top w0.406: v1@92.766,73.411 LED6.4@93.605,73.411
  Bottom w0.254: v1(92.761,73.406) 92.171,72.816 92.171,61.174 v1(93.832,59.512)
NetQ1_3: Q1.3 R25.2 R26.2
NetR12_Relay0_1: R12_Relay0.1 RV1_Relay0.1 | length 3.4
  Top w0.6: R12_Relay0.1@18.226,3.2 19.21,4.185 RV1_Relay0.1@19.21,6.147
NetR12_Relay1_1: R12_Relay1.1 RV1_Relay1.1 | length 3.4
  Top w0.6: R12_Relay1.1@28.124,3.2 29.108,4.185 RV1_Relay1.1@29.108,6.147
NetR12_Relay2_1: R12_Relay2.1 RV1_Relay2.1 | length 3.4
  Top w0.6: R12_Relay2.1@37.954,3.2 38.938,4.185 RV1_Relay2.1@38.938,6.147
NetR12_Relay3_1: R12_Relay3.1 RV1_Relay3.1 | length 3.4
  Top w0.6: R12_Relay3.1@48.063,3.2 49.047,4.185 RV1_Relay3.1@49.047,6.147
NetR12_Relay4_1: R12_Relay4.1 RV1_Relay4.1 | length 3.4
  Top w0.6: R12_Relay4.1@58.096,3.2 59.08,4.185 RV1_Relay4.1@59.08,6.147
NetR12_Relay5_1: R12_Relay5.1 RV1_Relay5.1 | length 3.4
  Top w0.6: R12_Relay5.1@68.053,3.2 69.037,4.185 RV1_Relay5.1@69.037,6.147
NetR12_Relay6_1: R12_Relay6.1 RV1_Relay6.1 | length 3.4
  Top w0.6: R12_Relay6.1@78.111,3.2 79.096,4.185 RV1_Relay6.1@79.096,6.147
NetR13_Relay0_1: R13_Relay0.1 U13_Relay0.1 | length 8.3
  Top w0.3: R13_Relay0.1@22.047,16.294 22.644,16.294 22.936,16.002 22.936,13.984 23.749,13.172 U13_Relay0.1@23.749,9.068
NetR13_Relay1_1: R13_Relay1.1 U13_Relay1.1 | length 8.3
  Top w0.3: R13_Relay1.1@31.953,16.294 31.964,16.283 32.525,16.283 32.81,15.998 32.81,14.038 33.73,13.118 U13_Relay1.1@33.73,9.068
NetR13_Relay2_1: R13_Relay2.1 U13_Relay2.1 | length 8.5
  Top w0.3: R13_Relay2.1@41.732,16.243 42.438,16.243 42.846,15.836 42.846,13.929 43.818,12.957 U13_Relay2.1@43.818,9.068
NetR13_Relay3_1: R13_Relay3.1 U13_Relay3.1 | length 8.2
  Top w0.3: R13_Relay3.1@52.07,16.294 52.54,16.294 52.832,16.002 52.832,13.538 53.648,12.723 U13_Relay3.1@53.648,9.068
NetR13_Relay4_1: R13_Relay4.1 U13_Relay4.1 | length 8.3
  Top w0.3: R13_Relay4.1@61.773,16.294 R13_Relay4.1@61.798,16.294 62.42,16.294 62.738,15.977 62.738,13.908 63.528,13.118 U13_Relay4.1@63.528,9.068
NetR13_Relay5_1: R13_Relay5.1 U13_Relay5.1 | length 8.2
  Top w0.3: R13_Relay5.1@71.704,16.294 72.262,16.294 72.542,16.014 72.542,14.035 73.333,13.245 U13_Relay5.1@73.333,9.068
NetR13_Relay6_1: R13_Relay6.1 U13_Relay6.1 | length 8.4
  Top w0.3: R13_Relay6.1@81.61,16.294 81.616,16.289 82.314,16.289 82.55,16.053 82.55,12.359 83.366,11.544 U13_Relay6.1@83.366,9.068
NetR14_1: R14.1 U14.10 | length 2.9
  Top w0.254: U14.10@65.903,67.684 66.82,67.684 67.005,67.869 67.005,68.732 66.732,69.006 R14.1@66.226,69.006
NetR18_1: R18.1 U15.10
NetR19_1: R19.1 U15.11
O: BR1_Relay4.4 J7.2 K1_Relay4.3 K1_Relay4.8 RV1_Relay4.2 | length 53.1
  Top w0.6: BR1_Relay4.4@61.75,8.522 61.75,5.001 62.604,4.147 RV1_Relay4.2@64.16,4.147
  PWR w0.6: K1_Relay4.3@57.937,-5.309 60.463,-5.309 ; J7.2@63.779,28.503 66.112,28.503 66.99,27.625 66.99,11.303 64.16,8.474 RV1_Relay4.2@64.16,4.147 62.078,2.064 62.078,-3.694 60.463,-5.309 ; K1_Relay4.8@65.557,-5.309 60.463,-5.309
PWRKEY: J5.9 P20.1 Q2.3 | length 10.7
  Top w0.305: J5.9@2.961,58.409 v1(4.451,58.409) 6.367,58.409 6.865,58.906 Q2.3@6.865,60.295
  Bottom w0.381: v1(4.451,58.409) 4.451,56.04 5.246,55.245 P20.1@6.934,55.245
RC: BR1_Relay0.3 BR1_Relay1.3 BR1_Relay4.3 BR1_Relay6.3 J6.4 K1_Relay0.4 K1_Relay0.7 K1_Relay1.4 K1_Relay1.7 K1_Relay4.4 K1_Relay4.7 K1_Relay6.4 K1_Relay6.7 R12_Relay0.2 R12_Relay1.2 R12_Relay4.2 R12_Relay6.2 | length 225.7
  Top w0.6: BR1_Relay0.3@17.747,8.903 17.733,8.889 17.733,7.644 17.286,7.197 R12_Relay0.2@17.286,3.2 17.286,2.243 17.714,1.815 19.688,1.815 20.157,1.346 20.157,-2.062 19.45,-2.769 ; K1_Relay0.4@17.958,-2.769 19.45,-2.769 ; BR1_Relay1.3@27.722,8.903 27.715,8.896 27.715,7.637 27.268,7.19 R12_Relay1.2@27.268,3.247 27.268,2.305 27.744,1.829 29.515,1.829 29.972,1.372 29.972,-2.2 29.403,-2.769 K1_Relay1.4@27.94,-2.769 K1_Relay0.7@25.578,-2.769 19.45,-2.769 ; K1_Relay4.4@57.669,-2.654 57.678,-2.645 K1_Relay4.4@57.937,-2.645 ; BR1_Relay4.3@57.694,8.903 57.658,8.867 57.658,7.666 57.206,7.214 R12_Relay4.2@57.206,3.247 57.206,2.092 57.57,1.727 59.355,1.727 59.883,1.2 59.883,-2.177 59.291,-2.769 K1_Relay4.4@57.937,-2.769 ; BR1_Relay6.3@77.506,8.903 77.506,8.603 77.191,8.288 R12_Relay6.2@77.191,3.251 77.191,2.184 77.622,1.753 79.756,1.753 80.215,1.293 80.215,-2.063 79.51,-2.769 K1_Relay6.4@77.927,-2.769
  GND w0.6: K1_Relay0.7@25.578,-2.769 23.597,-2.769 22.073,-1.245 22.073,24.823 J6.4@25.75,28.5 ; K1_Relay1.4@27.94,-2.769 K1_Relay1.7@35.56,-2.769 ; K1_Relay4.4@57.937,-2.769 K1_Relay4.7@65.557,-2.769
  Bottom w0.6: K1_Relay1.4@27.888,-2.654 33.033,-2.654 ; K1_Relay1.7@35.508,-2.654 33.033,-2.654 ; K1_Relay4.4@57.937,-2.769 62.941,-2.769 ; 61.697,-12.446 61.697,-4.013 62.941,-2.769 ; K1_Relay4.7@65.557,-2.769 62.941,-2.769 ; K1_Relay6.4@77.951,-2.745 83.273,-2.745 ; K1_Relay6.7@85.523,-2.745 83.273,-2.745 ; 33.033,-2.654 31.867,-3.82 31.867,-11.446 33.157,-12.736 80.907,-12.736 82.118,-11.525 82.118,-3.899 83.273,-2.745
RELAY_IN_Relay2: BR1_Relay2.3 BR1_Relay3.3 BR1_Relay5.3 J6.5 K1_Relay2.4 K1_Relay2.7 K1_Relay3.4 K1_Relay3.7 K1_Relay5.4 K1_Relay5.7 R12_Relay2.2 R12_Relay3.2 R12_Relay5.2 | length 160
  Top w0.6: BR1_Relay2.3@37.533,8.903 37.526,8.896 37.526,7.637 37.083,7.195 R12_Relay2.2@37.083,3.247 37.083,2.414 37.49,2.007 39.522,2.007 39.903,1.626 39.903,-1.676 38.926,-2.654 ; K1_Relay2.4@37.948,-2.769 43.282,-2.769 ; BR1_Relay3.3@47.643,8.903 47.567,8.827 47.567,7.71 47.193,7.336 R12_Relay3.2@47.193,3.247 47.193,2.337 47.6,1.93 49.495,1.93 50.063,1.362 50.063,-1.867 49.162,-2.769 ; K1_Relay3.7@55.55,-2.769 49.162,-2.769 ; BR1_Relay5.3@67.607,8.903 67.458,8.753 67.458,7.784 67.157,7.484 R12_Relay5.2@67.157,3.247 67.157,2.265 67.638,1.784 70.031,1.784 70.522,1.294 70.522,-1.943 69.696,-2.769 ; K1_Relay5.4@67.945,-2.769 69.696,-2.769 ; K1_Relay5.7@75.565,-2.769 72.375,-2.769 ; 43.282,-2.769 41.606,-4.445 41.606,-11.323 42.811,-12.529 70.213,-12.529 71.15,-11.592 71.15,-3.993 72.375,-2.769 ; 43.282,-2.769 K1_Relay2.7@45.568,-2.769 K1_Relay3.4@47.93,-2.769 49.162,-2.769 ; 69.696,-2.769 72.375,-2.769
  GND w0.6: J6.5@25.75,23.5 25.75,23.339 27.041,22.049 27.041,3.339 28.5,1.88 39.04,1.88 43.688,-2.769 K1_Relay2.7@45.568,-2.769
RELAY_O0: BR1_Relay0.4 J6.1 K1_Relay0.3 K1_Relay0.8 RV1_Relay0.2 | length 68
  Top w0.6: BR1_Relay0.4@21.847,8.903 21.847,5.007 22.707,4.147 RV1_Relay0.2@24.29,4.147
  PWR w0.6: K1_Relay0.3@17.958,-5.309 20.536,-5.309 ; K1_Relay0.8@25.578,-5.309 20.536,-5.309 ; J6.1@25.75,43.5 20.98,38.73 20.98,7.456 RV1_Relay0.2@24.29,4.147 22.022,1.879 22.022,-3.823 20.536,-5.309
RELAY_O2: BR1_Relay2.4 J6.3 K1_Relay2.3 K1_Relay2.8 RV1_Relay2.2 | length 74.4
  Top w0.6: BR1_Relay2.4@41.633,8.903 41.633,4.772 42.259,4.147 RV1_Relay2.2@44.018,4.147
  PWR w0.6: J6.3@25.75,33.5 23.368,31.118 23.368,13.853 25.359,11.862 42.57,11.862 44.018,10.414 RV1_Relay2.2@44.018,4.147 41.961,2.089 41.961,-3.554 40.207,-5.309 ; K1_Relay2.3@37.948,-5.309 40.207,-5.309 ; K1_Relay2.8@45.568,-5.309 40.207,-5.309
RELAY_O5: BR1_Relay5.4 J7.3 K1_Relay5.3 K1_Relay5.8 RV1_Relay5.2 | length 60.2
  Top w0.6: BR1_Relay5.4@71.682,8.522 71.682,4.823 72.358,4.147 RV1_Relay5.2@74.117,4.147
  PWR w0.6: J7.3@63.779,33.503 66.446,33.503 68.231,31.718 68.231,11.372 74.114,5.489 74.114,4.15 RV1_Relay5.2@74.117,4.147 72.466,2.496 72.466,-3.256 70.413,-5.309 ; K1_Relay5.3@67.945,-5.309 70.413,-5.309 ; K1_Relay5.8@75.565,-5.309 70.413,-5.309
RELAY_O6: BR1_Relay6.4 J7.4 K1_Relay6.3 K1_Relay6.8 RV1_Relay6.2 | length 77.6
  Top w0.6: BR1_Relay6.4@81.588,8.522 81.588,4.945 82.385,4.147 RV1_Relay6.2@84.176,4.147
  PWR w0.6: J7.4@63.779,38.503 63.928,38.354 67.894,38.354 69.444,36.805 69.444,12.017 70.79,10.671 83.022,10.671 84.176,9.518 RV1_Relay6.2@84.176,4.147 82.118,2.089 82.118,-3.14 79.949,-5.309 ; K1_Relay6.3@77.927,-5.309 79.949,-5.309 ; K1_Relay6.8@85.547,-5.309 79.949,-5.309
RELAY_RESET_Relay0: K1_Relay0.6 U11.16 | length 63.8
  Top w0.3: U11.16@69.57,21.59 69.583,21.577 71.158,21.577 v1(71.171,21.565)
  Bottom w0.3: K1_Relay0.6@25.578,-0.229 25.578,1.941 27.381,3.744 27.381,13.426 29.145,15.189 65.91,15.189 71.171,20.45 v1(71.171,21.565)
RELAY_RESET_Relay1: K1_Relay1.6 U11.14 | length 64.9
  Top w0.3: U11.14@69.57,24.13 v1@72.466,24.13
  Bottom w0.3: K1_Relay1.6@35.56,-0.229 32.131,3.2 32.131,12.649 33.503,14.021 66.831,14.021 72.466,19.656 v1@72.466,24.13
  other v1: 72.492,24.13
RELAY_RESET_Relay2: K1_Relay2.6 U11.12 | length 59.4
  Top w0.3: U11.12@69.569,26.669 69.6,26.638 72.486,26.638 v1(72.517,26.608)
  Bottom w0.3: K1_Relay2.6@45.568,-0.229 42.088,3.251 42.088,11.938 43.078,12.929 67.793,12.929 73.787,18.923 73.787,25.338 v1(72.517,26.608)
RELAY_RESET_Relay3: K1_Relay3.6 U11.10 | length 51.8
  Top w0.3: v1(55.651,10.592) v1(55.651,12.177) ; U11.10@69.569,29.209 v1(71.104,29.209)
  Bottom w0.3: K1_Relay3.6@55.55,-0.229 52.082,3.24 52.082,9.765 52.908,10.592 v1(55.651,10.592) ; v1(55.651,12.177) 68.019,12.177 74.327,18.484 74.327,25.987 v1(71.104,29.209)
RELAY_RESET_Relay4: K1_Relay4.6 U12.15 | length 39.4
  Top w0.3: U12.15@78.646,22.834 78.672,22.86 80.822,22.86 v1(80.848,22.885)
  Bottom w0.3: K1_Relay4.6@65.557,-0.229 62.128,3.2 62.128,9.446 62.868,10.185 71.145,10.185 80.848,19.888 v1(80.848,22.885)
RELAY_RESET_Relay5: K1_Relay5.6 U12.13 | length 34.4
  Top w0.3: U12.13@78.646,25.374 81.662,25.374 v1(82.22,24.816)
  Bottom w0.3: K1_Relay5.6@75.565,-0.229 72.161,3.175 72.161,9.703 82.22,19.761 v1(82.22,24.816)
RELAY_RESET_Relay6: K1_Relay6.6 U12.11 | length 33.7
  Top w0.3: U12.11@78.646,27.914 78.659,27.927 81.087,27.927 v1(81.1,27.94) v1@81.204,27.94
  Bottom w0.3: v1(81.1,27.94) 83.464,25.576 83.464,19.235 82.118,17.889 82.118,3.2 K1_Relay6.6@85.547,-0.229
RELAY_SET_Relay0: K1_Relay0.5 U11.15 | length 69.9
  Top w0.3: U11.15@69.569,22.859 69.583,22.872 70.548,22.872 v1(70.561,22.885)
  Bottom w0.3: K1_Relay0.5@17.958,-0.229 22.365,-0.229 26.69,4.096 26.69,13.66 28.804,15.773 65.43,15.773 70.561,20.904 v1@70.561,22.86
RELAY_SET_Relay1: K1_Relay1.5 U11.13 | length 65.3
  Top w0.3: U11.13@69.569,25.399 v1(71.104,25.399)
  Bottom w0.3: K1_Relay1.5@27.94,-0.229 31.394,3.226 31.394,13.03 32.969,14.605 66.428,14.605 71.847,20.024 71.847,24.657 v1(71.104,25.399)
RELAY_SET_Relay2: K1_Relay2.5 U11.11 | length 59.7
  Top w0.3: U11.11@69.569,27.939 U11.11@69.855,27.939 ; U11.11@69.829,27.914 U11.11@69.855,27.939 ; v1(71.104,27.939) U11.11@69.855,27.939
  Bottom w0.3: K1_Relay2.5@37.948,-0.229 41.427,3.251 41.427,12.294 42.621,13.487 67.284,13.487 73.216,19.419 73.216,24.541 71.104,26.653 v1(71.104,27.939)
RELAY_SET_Relay3: K1_Relay3.5 U12.16 | length 45.7
  Top w0.3: v1(77.673,21.565) U12.16@78.646,21.564
  Bottom w0.3: K1_Relay3.5@47.93,-0.229 51.41,3.251 51.41,10.25 52.513,11.354 70.714,11.354 77.673,18.313 v1(77.673,21.565)
RELAY_SET_Relay4: K1_Relay4.5 U12.14 | length 40.1
  Top w0.3: U12.14@78.646,24.104 U12.14@78.779,24.104 ; U12.14@78.874,24.009 U12.14@78.779,24.104 ; v1(80.181,24.104) U12.14@78.779,24.104
  Bottom w0.3: K1_Relay4.5@57.937,-0.229 61.316,3.15 61.316,9.423 62.636,10.744 70.993,10.744 80.181,19.932 v1(80.181,24.104)
RELAY_SET_Relay5: K1_Relay5.5 U12.12 | length 34.6
  Top w0.3: U12.12@78.646,26.644 v1(80.181,26.644)
  Bottom w0.3: K1_Relay5.5@67.945,-0.229 71.349,3.175 71.349,9.627 81.546,19.824 81.546,25.279 v1(80.181,26.644)
RELAY_SET_Relay6: K1_Relay6.5 U12.10 | length 34.1
  Top w0.3: U12.10@78.646,29.184 v1(80.181,29.184)
  Bottom w0.3: K1_Relay6.5@77.927,-0.229 81.28,3.124 81.28,17.917 82.906,19.542 82.906,25.108 80.181,27.832 v1(80.181,29.184)
RELAY_STS_Relay0: R10.1 R11.1 U13_Relay0.4 U13_Relay1.4 U13_Relay2.4 U13_Relay3.4 U13_Relay4.4 U13_Relay5.4 U13_Relay6.4 | length 91
  Top w0.3: U13_Relay0.4@23.749,15.318 23.749,17.228 24.785,18.264 34.579,18.264 ; U13_Relay1.4@33.73,15.318 33.73,17.415 34.579,18.264 ; U13_Relay2.4@43.818,15.318 43.818,17.394 44.688,18.264 ; U13_Relay3.4@53.648,14.772 U13_Relay3.4@53.648,15.318 53.648,17.394 54.518,18.264 ; U13_Relay4.4@63.554,14.772 U13_Relay4.4@63.554,15.318 63.554,17.459 64.358,18.264 ; U13_Relay5.4@73.333,14.772 U13_Relay5.4@73.333,15.318 73.333,17.59 74.007,18.264 ; R11.1@88.006,9.853 R10.1@86.944,9.853 86.083,9.853 83.366,12.57 U13_Relay6.4@83.366,15.318 83.366,17.498 82.6,18.264 74.007,18.264 ; 34.579,18.264 44.688,18.264 ; 44.688,18.264 54.518,18.264 ; 54.518,18.264 63.965,18.264 64.358,18.264 ; 64.358,18.264 73.744,18.264 74.007,18.264